# Altium PCB BB-18 Control Board.PcbDoc (part 2 of 2)
Units mil, origin at the board's own origin, x right, y up, seen from the top; angles counter-clockwise.
Board outline 5999.87 x 5500 mil, 2 copper layers (Top Layer, Bottom Layer); 86 components, 72 nets, 393 pads, 7 vias.
Unrouted connection lines stored in the file: 230.
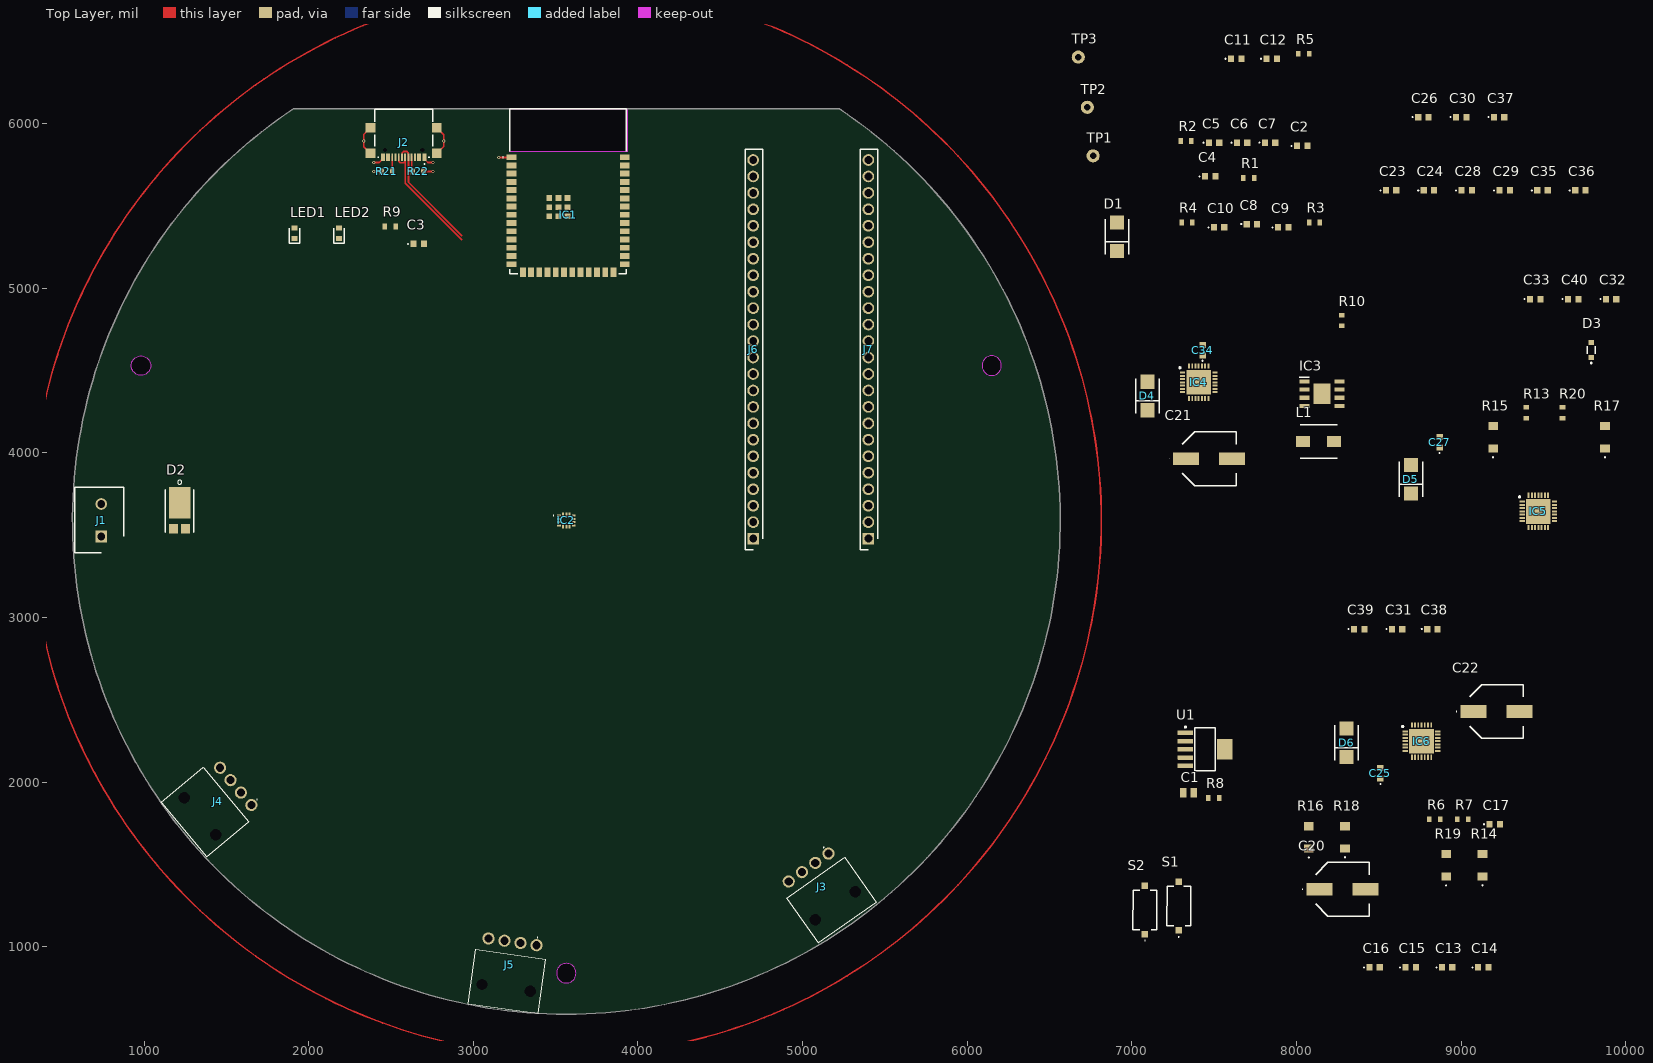
[diagram p0: Top Layer view]

## Via types
v1: diameter 20, hole 10, Top Layer to Bottom Layer, tented both sides, 7 vias

## Nets (pads, with @x,y where several pads share a name; then routed paths per layer and width w, separated by ;. In a path a pad name is that pad's centre, name@x,y a point inside that pad or via, vN(x,y) a via of type N, cw(c..) or ccw(c..) an arc to the next point about the centre after c; other vN are vias at no path point) (continued)
UART: IC1.11 IC4.14 IC5.14 IC6.14 R4.1
USB_D+: C6.2 J2.A6 J2.B6 R7.1 | length 740.8
  Top Layer w10: J2.B6 2547.95,5796.73 2547.95,5772.32 2556.27,5764 2577.19,5764 2585.51,5772.32 2585.51,5796.73 J2.A6 2586.42,5638.58 2930,5295
USB_D-: C5.2 J2.A7 J2.B7 R6.1 | length 707.6
  Top Layer w10: J2.A7 2567.64,5798.54 2567.64,5822.96 2575.96,5831.28 2596.88,5831.28 2605.2,5822.96 2605.2,5798.54 J2.B7 2606.1,5643.9 2930,5320
V_Filtered: C12.1 D1.1 IC3.5 IC3.7
Vbatt: J1.2
VBatt_Post: C20.1 C21.1 C22.1 C23.2 C24.2 C25.2 C26.2 C27.2 C28.2 C29.2 C30.2 C31.2 D1.2 D2.1 D4.1 D5.1 D6.1 IC4.22 IC4.28 IC5.22 IC5.28 IC6.22 IC6.28
pads on no net: IC1.7 IC1.8 IC1.9 IC1.12 IC1.15 IC1.16 IC1.17 IC1.18 IC1.22 IC1.23 IC1.24 IC1.25 IC1.26 IC1.28 IC1.35 IC1.36 IC1.37 IC1.38 IC1.39 IC2.10 IC2.11 IC4.12 IC4.17 IC4.25 IC5.12 IC5.17 IC5.25 IC6.12 IC6.17 IC6.25 J2.A4 J2.A8 J2.A9 J2.B8 J2.MH1 J2.MH2 J3.MH1 J3.MH2 J4.MH1 J4.MH2 J5.MH1 J5.MH2 J6.1 J6.2 J6.3 J6.4 J6.5 J6.6 J6.8 J6.14 J6.15 J6.16 J6.17 J6.18 J6.19 J6.20 J6.21 J6.22 J6.23 J6.24 J7.2 J7.3 J7.4 J7.5 J7.6 J7.7 J7.9 J7.16 J7.18 J7.19 J7.20 J7.21 J7.22 J7.23 J7.24
copper on no net: | length 20420.4
  Top Layer w10: 6815,3590 ccw(c3565,3590) 6815,3590

## Polygon pours and split planes (outlines as drawn)
GND on Bottom Layer "GND_L02_P000" (solid, pour order 0): 55,6330 60,6325 6865,6325 6865,580 6555,270 285,270

## Silkscreen, mask and mechanical layers (free items; w line width, h text height)
Mechanical 39:
  circle w0.5: c6149.4,4530.81 r59.06
  circle w0.5: c981.1,4530.81 r59.06
  circle w0.5: c3565.25,840.25 r59.06
  lines w0.5: 1906.94,6090.25 ccw(c3565.25,3590.25) 5223.56,6090.25 1906.94,6090.25
  lines w2: 3220,5830 3935,5830 3935,6090 3220,6090 3220,5830